# Altium PCB Water Tank Telemeter.PcbDoc (part 1 of 2)
Units mil, origin at the board's own origin, x right, y up, seen from the top; angles counter-clockwise.
Board outline 8312.51 x 5080.46 mil, 2 copper layers (Top Layer, Bottom Layer); 201 components, 141 nets, 680 pads, 198 vias.
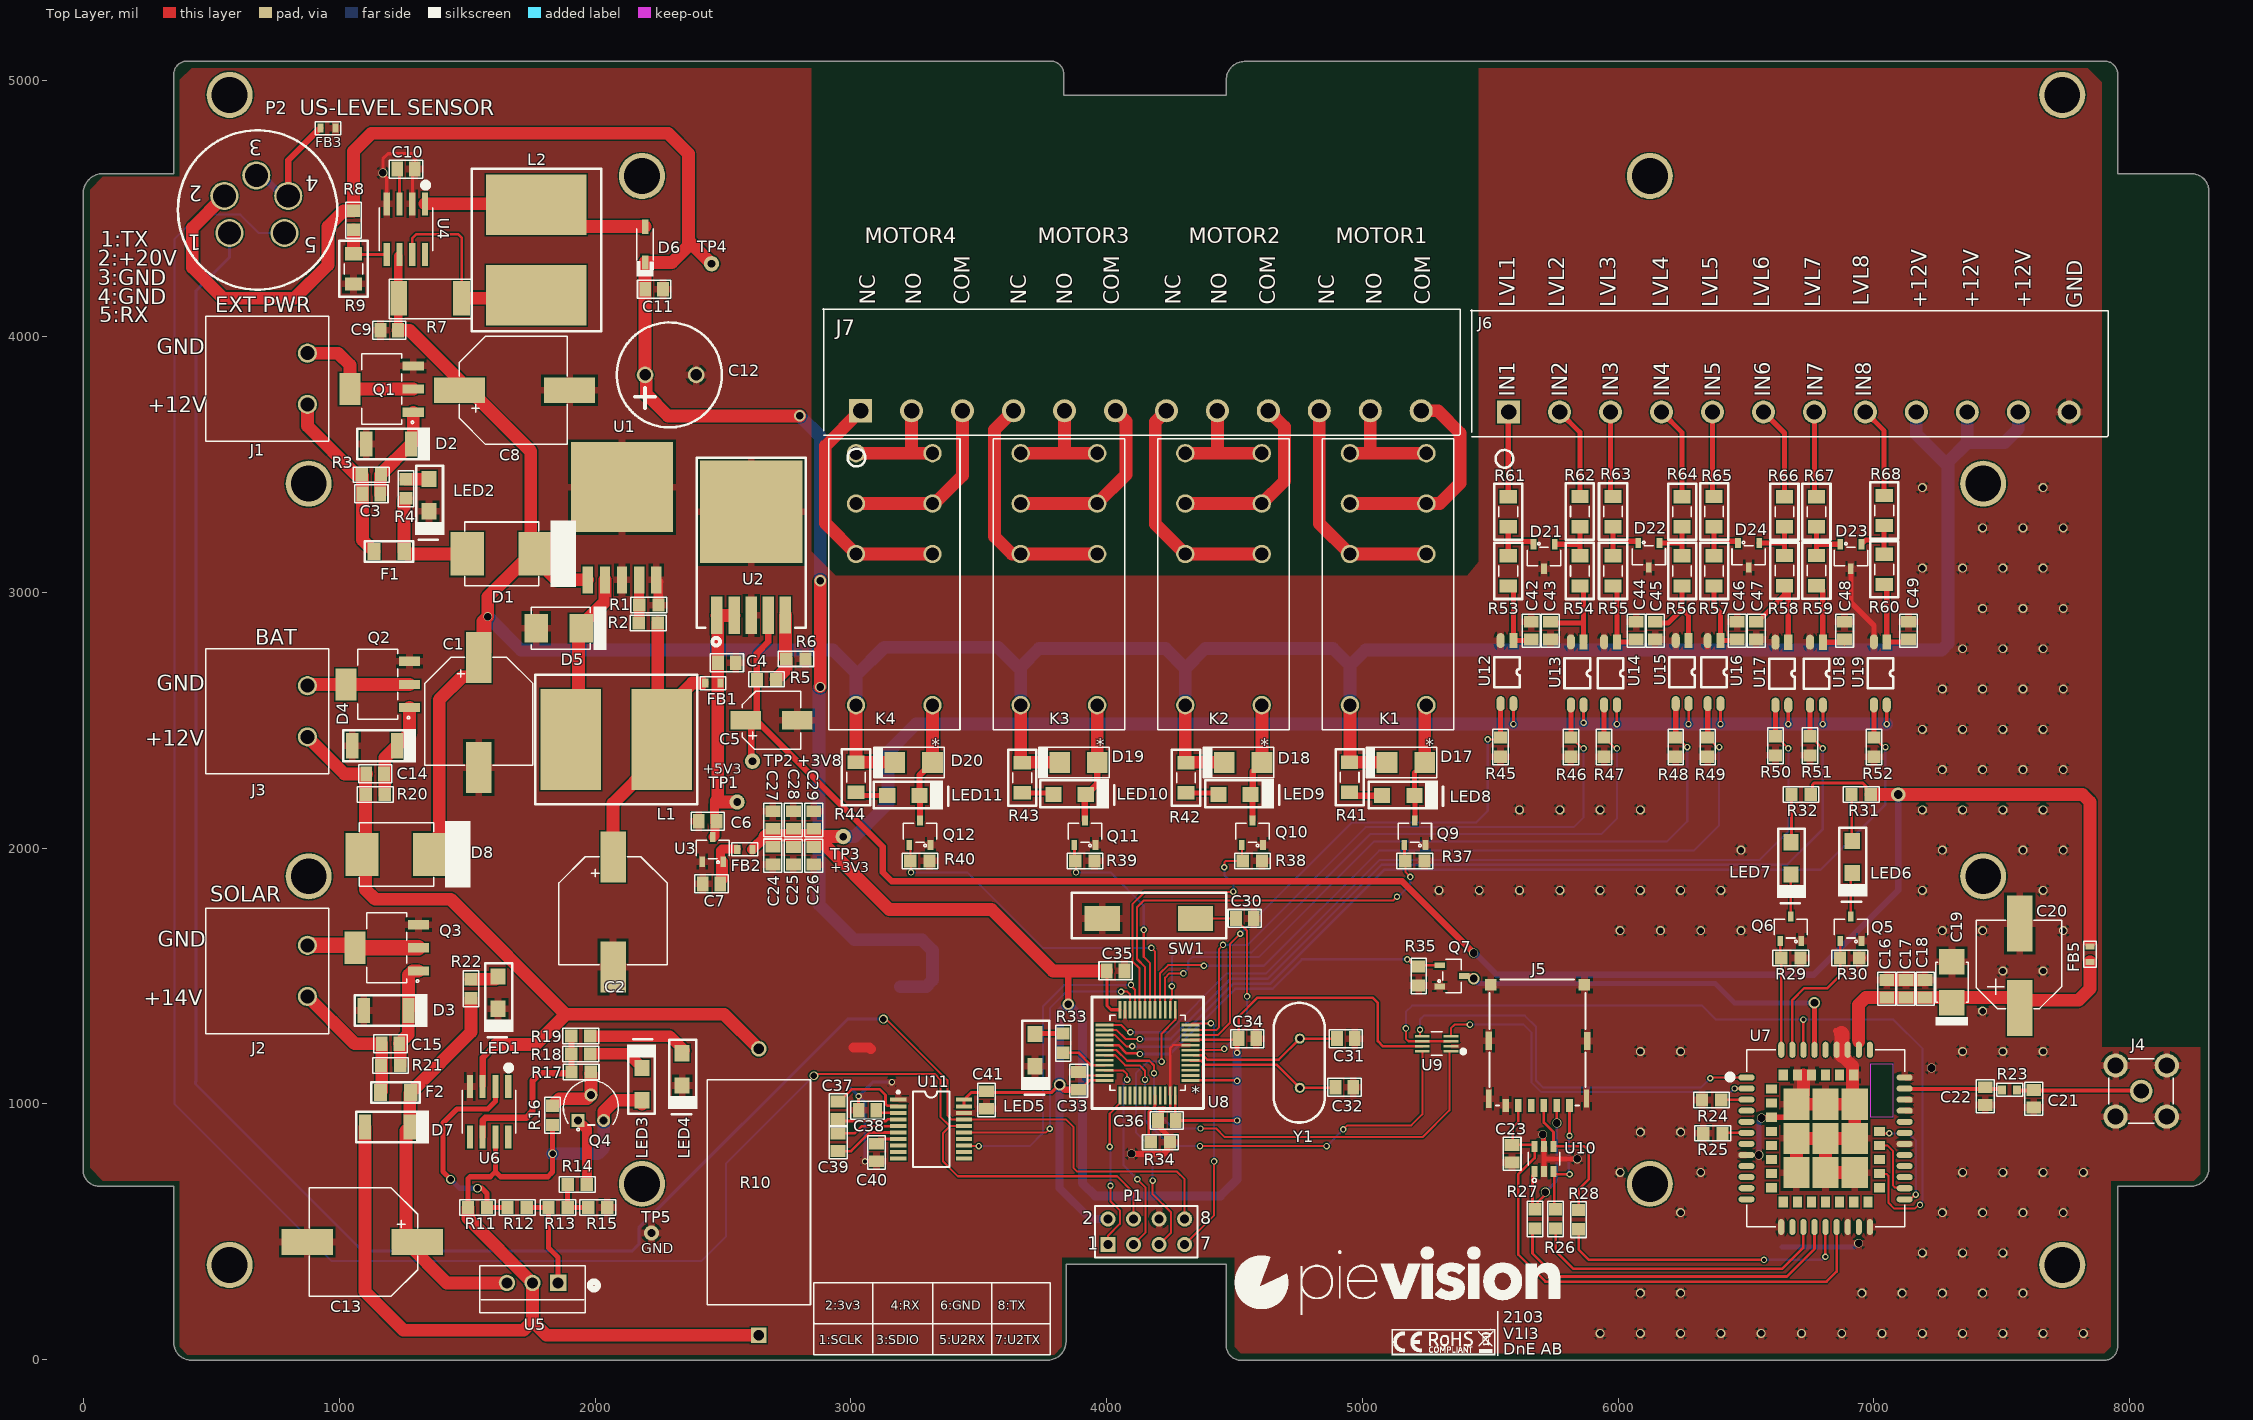
[diagram p0: Top Layer view]
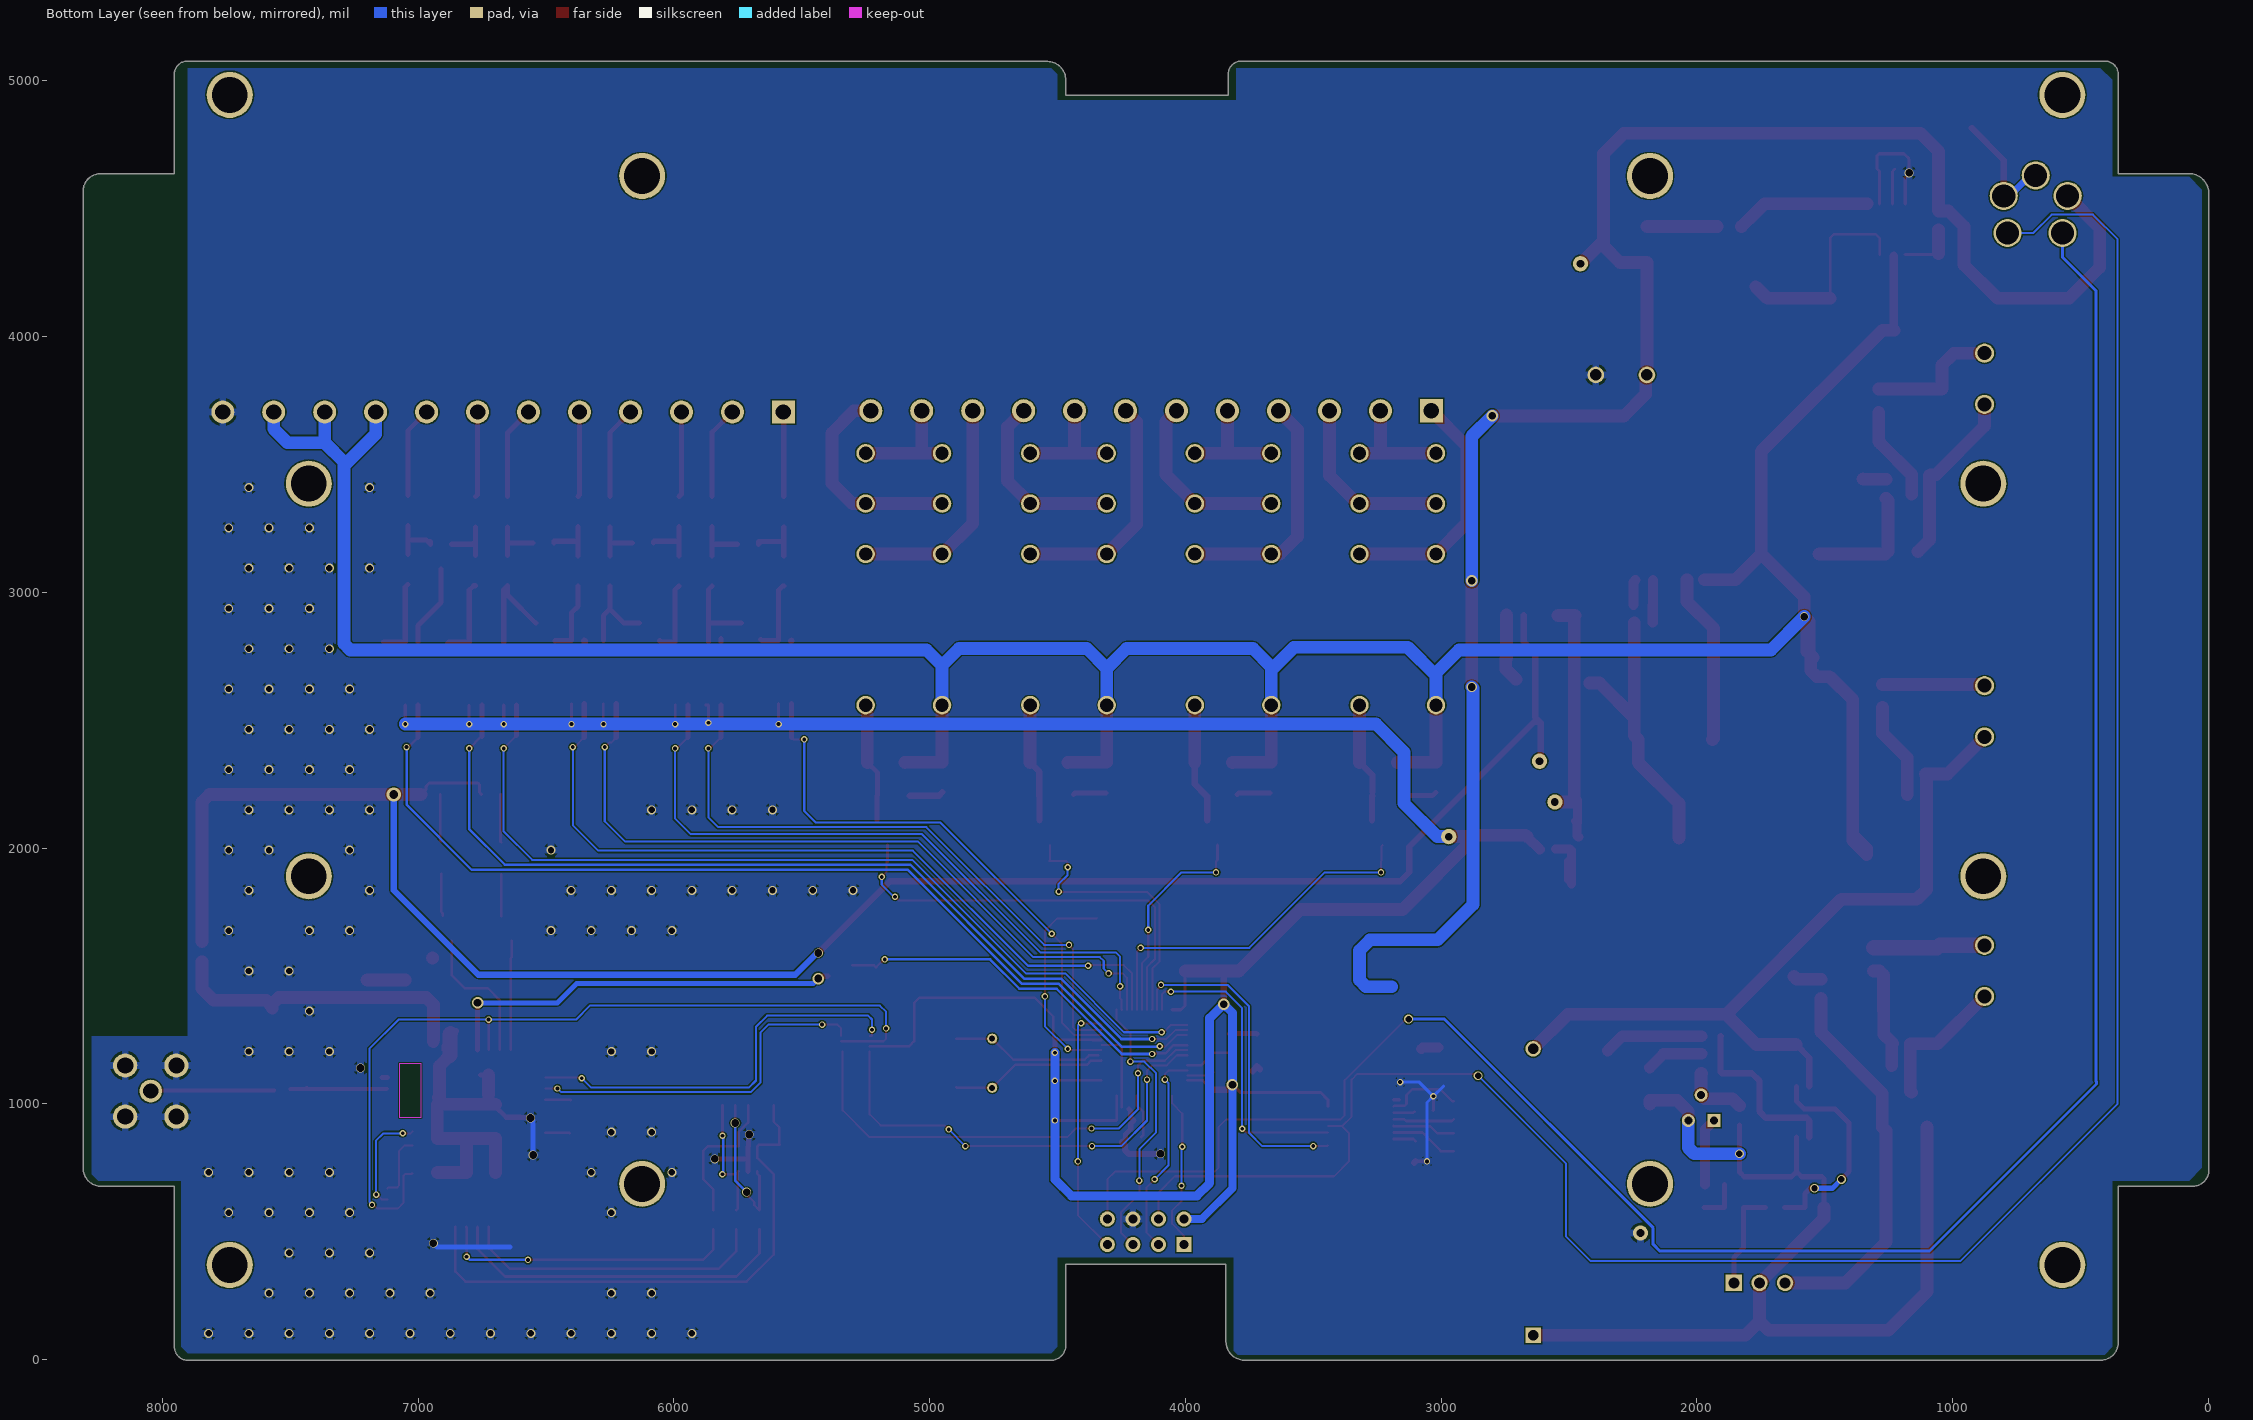
[diagram p1: Bottom Layer view, seen from below]
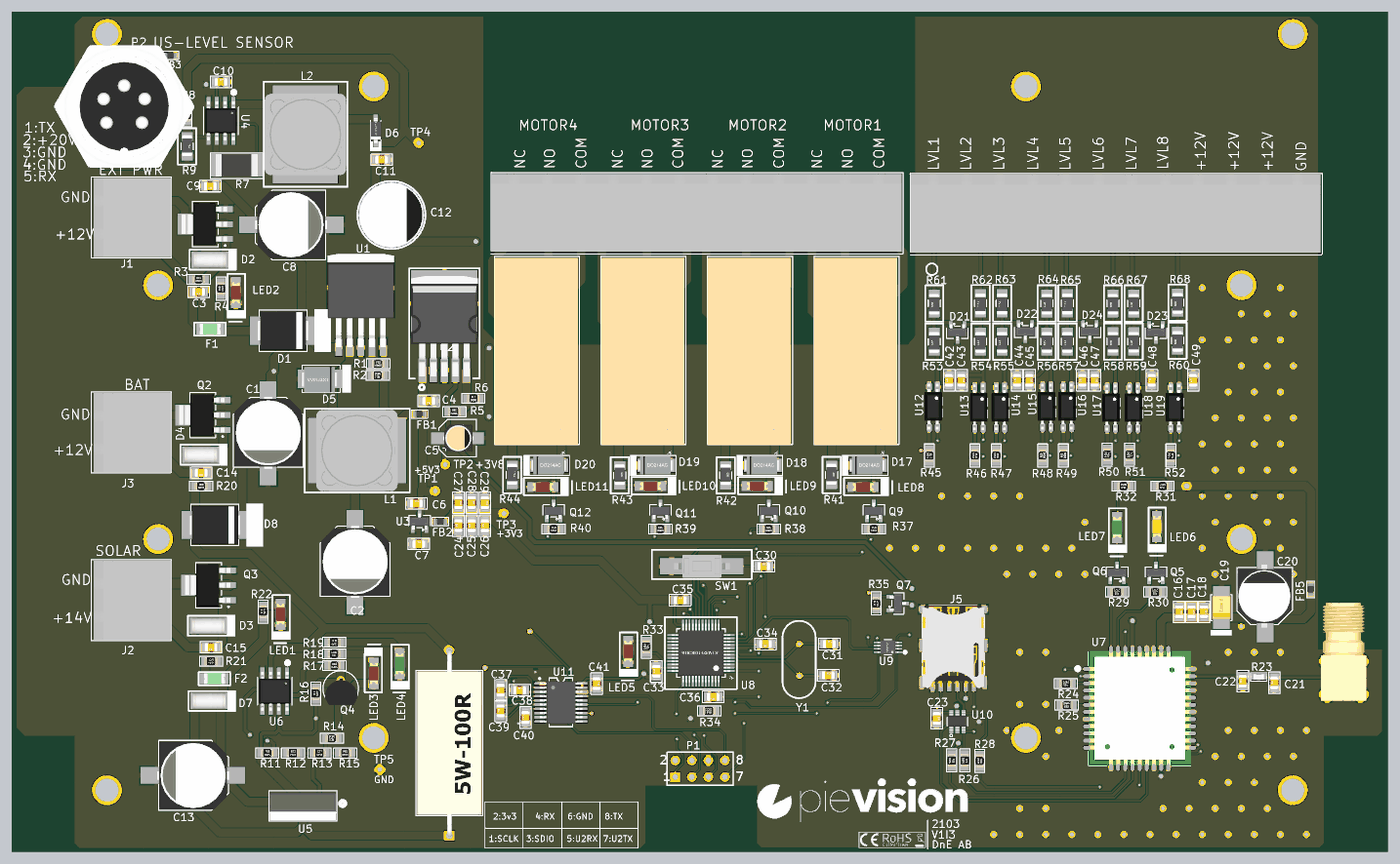
[diagram p3: 3D render of the assembled board from above, using the file's embedded part models]

## Layer stack, top to bottom
Top Solder: solder mask 0.4, Solder Resist, Dk 3.5
Top Layer: signal copper 1.4
Dielectric1: dielectric 12.6, FR-4, Dk 4.8
Bottom Layer: signal copper 1.4
Bottom Solder: solder mask 0.4, Solder Resist, Dk 3.5

## Board outline
351.82,70.04 ccw(c422.17,67.83) 419.92,-2.51 ccw(c420,0) 420,-2.51 3763.13,-2.51 ccw(c3764.54,-0.43) 3764.48,-2.95 ccw(c3766.35,71.8) 3841.1,69.94 ccw(c3838.58,70) 3841.1,70 3841.1,371.75 ccw(c3840,374.02) 3842,372.48 4467.48,372.48 4467.48,54.99 ccw(c4524.99,54.99) 4524.98,-2.51 ccw(c4524.98,0) 4524.98,-2.51 7898.91,-2.51 ccw(c7900,-0.25) 7900,-2.76 ccw(c7900,50) 7952.76,50 ccw(c7950.25,50) 7952.51,51.09 7952.51,677.48 8238.26,677.48 ccw(c8238.54,748.54) 8309.6,748.26 ccw(c8307.09,748.27) 8309.6,748.27 8309.6,4566.17 ccw(c8307.48,4567.52) 8310,4567.52 ccw(c8240,4567.52) 8240,4637.52 7952.51,4637.52 7952.51,5025 ccw(c7902.99,5027.06) 7952.56,5027.06 ccw(c7902.99,5027.06) 7952.51,5029.12 7952.51,5035 ccw(c7950,5035) 7951.56,5036.98 ccw(c7902.99,5027.06) 7899.92,5076.53 4540,5076.53 ccw(c4540,5074.02) 4538.24,5075.81 ccw(c4540,5003.32) 4467.49,5004.04 ccw(c4470,5004.01) 4467.51,5003.68 ccw(c4470,5003.32) 4467.48,5003.32 4467.48,4943.5 3832.52,4943.5 3832.52,5025 ccw(c3780,5025) 3780,5077.52 405,5077.52 ccw(c405,5025) 352.48,5025 352.48,4637.52 75.91,4637.52 ccw(c75.91,4635) 75.88,4637.51 ccw(c76.79,4558.21) -2.51,4557.33 ccw(c76.79,4558.21) -2.51,4557.31 -2.51,4557.34 -2.51,745.05 ccw(c62.5,742.5) 59.9,677.49 ccw(c60,680) 60,677.48 351.82,677.48 351.82,70.04 cw(c422.17,67.83)

## Design rules (kind name [scope] priority, off if disabled: settings)
Clearance [All] p1: gap=5 ignorepadtopadclearanceinfootprint=FALSE except(0: Arc-Hole Track-Hole SMDPad-Hole Via-Hole Fill-Hole Poly-Hole Region-Hole Text-Hole; 1: Arc-Text Track-Text SMDPad-Text THPad-Text Via-Text Fill-Text Poly-Text Region-Text Text-Text; 8: Arc-SMDPad Track-SMDPad; 10: Arc-Arc Arc-Track Arc-Via Track-Track Track-Via SMDPad-Via THPad-Via Via-Via; 13: Arc-THPad Track-THPad SMDPad-THPad; 21.26: THPad-Hole; 22: THPad-THPad)
HoleSize [All] p1: absolutevalues=TRUE maxlimit=240 minlimit=8 maxpercent=80.000 minpercent=20.000
MinimumSolderMaskSliver [All] p1: minsoldermaskwidth=1
PolygonConnect [All] p1: connectstyle=Relief reliefconductorwidth=28 reliefentries=4 polygonreliefangle="90 Angle" airgapwidth=10
RoutingVias [All] p1: holewidth=30 width=35 viastyle="Through Hole" minholewidth=12 minwidth=24 maxholewidth=236 maxwidth=290
SilkToSilkClearance [All] p1: silktosilkclearance=0
SilkToSolderMaskClearance SilkscreenOverComponentPads [IsPad] p1: minsilkscreentomaskgap=0 clearancetoexposedcopper=TRUE
SolderMaskExpansion [All] p1: expansion=4 istentingtop=FALSE
Width [All] p1: maxlimit=80 minlimit=5 preferedwidth=10
26 further rules are at their usual default settings.

## Classes and differential pairs
component class Designator: C42 C43 C44 C45 C46 C47 C48 C49 D17 D18 D19 D20 D21 D22 D23 D24 FB3 J6 J7 K1 K2 K3 K4 LED8 LED9 LED10 LED11 P2 Q9 Q10 Q11 Q12 R37 R38 R39 R40 R41 R42 R43 R44 R45 R46 R47 R48 R49 R50 R51 R52 R53 R54 R55 R56 R57 R58 R59 R60 R61 R62 R63 R64 R65 R66 R67 R68 U12 U13 U14 U15 U16 U17 U18 U19
component class Designator: 30 C16 C17 C18 C19 C20 C21 C22 C23 C24 C25 C26 C27 C28 C29 C30 C31 C32 C33 C34 C35 C36 C37 C38 C39 C40 C41 FB5 J4 J5 LED5 LED6 LED7 P1 Q5 Q6 Q7 R23 R24 R25 R26 R27 R28 R29 R30 R31 R32 R33 R34 R35 S1 SW1 U7 U8 U9 U10 U11 Y1
component class Designator: C1 C2 C3 C4 C5 C6 C7 C8 C9 C10 C11 C12 C13 C14 C15 D1 D2 D3 D4 D5 D6 D7 D8 F1 F2 FB1 FB2 J1 J2 J3 L1 L2 LED1 LED2 LED3 LED4 Q1 Q2 Q3 Q4 R1 R2 R3 R4 R5 R6 R7 R8 R9 R10 R11 R12 R13 R14 R15 R16 R17 R18 R19 R20 R21 R22 TP1 TP2 TP3 TP4 TP5 U1 U2 U3 U4 U5 U6

## Components (designator, comment, footprint, x,y, rotation, side; value= is the part's Value field where it differs from the comment)
C1 "100uF" CAP_AL_1010 1545,2535 r270 top
C2 "470uF" CAP_AL_1010 2070,1755 r270 top
C3 "10nF" CAP_0805 1125,3385 r180 top
C4 "330nF" CAP_0805 2515,2725 r180 top
C5 "10uF" CAP_AL_0553 2689.5,2500 r0 top
C6 "1uF" CAP_0805 2440,2105 r0 top
C7 "1uF" CAP_0805 2455,1860 r0 top
C8 "470uF" CAP_AL_1010 1680,3790 r0 top
C9 "100nF" CAP_0805 1195,4025 r180 top
C10 "2.2nF" CAP_0805 1260,4655 r0 top
C11 "100nF" CAP_0805 2230.55,4185 r0 top
C12 "330uF" CAP_AL_THT_10X20X5MM 2195,3850 r0 top
C13 "100uF" CAP_AL_1010 1094.5,460 r180 top
C14 "10nF" CAP_0805 1140,2290 r180 top
C15 "10nF" CAP_0805 1200,1235 r180 top
C16 "10nF" CAP_0805 7050,1450 r270 top
C17 "33pF" CAP_0805 7125,1450 r270 top
C18 "1uF" CAP_0805 7200,1450 r270 top
C19 "100uF" CAP_TANT_CASEB 7305,1475 r90 top
C20 "1000uF" CAP_AL_0810 7570,1545 r90 top
C21 "22pF" CAP_0805 7625,1020 r90 top
C22 "22pF" CAP_0805 7435,1030 r90 top
C23 "1uF" CAP_0805 5585,805 r270 top
C24 "10nF" CAP_0805 2695,1970.55 r90 top
C25 "10nF" CAP_0805 2775,1970 r90 top
C26 "100nF" CAP_0805 2855,1970 r90 top
C27 "100nF" CAP_0805 2695,2110 r270 top
C28 "100nF" CAP_0805 2775,2110 r270 top
C29 "1uF" CAP_0805 2855,2110 r270 top
C30 "100nF" CAP_0805 4540,1725 r0 top
C31 "20pF" CAP_0805 4935,1255 r0 top
C32 "20pF" CAP_0805 4929.45,1065 r0 top
C33 "100nF" CAP_0805 3890,1090 r90 top
C34 "100nF" CAP_0805 4550,1255 r180 top
C35 "100nF" CAP_0805 4035,1520 r0 top
C36 "4.7uF" CAP_0805 4235,935 r180 top
C37 "100nF" CAP_0805 2950,975 r90 top
C38 "100nF" CAP_0805 3065,975 r0 top
C39 "100nF" CAP_0805 2950,850 r90 top
C40 "100nF" CAP_0805 3100,810 r90 top
C41 "100nF" CAP_0805 3530,1015 r270 top
C42 "100nF" CAP_0805 5660,2850 r90 top
C43 "100nF" CAP_0805 5735,2850 r270 top
C44 "100nF" CAP_0805 6070,2850 r90 top
C45 "100nF" CAP_0805 6145,2850 r270 top
C46 "100nF" CAP_0805 6465,2850 r90 top
C47 "100nF" CAP_0805 6540,2850 r270 top
C48 "100nF" CAP_0805 6885,2850 r90 top
C49 "100nF" CAP_0805 7135,2850 r90 top
D1 "S6M" DO-214AB 1635,3150 r180 top
D2 "ZM4740" MELF 1205,3580 r180 top
D3 "ZM4740" MELF 1195,1365 r180 top
D4 "ZM4740" MELF 1150,2400 r180 top
D5 "SR35_R2_00001" DO214AA 1865,2860 r180 top
D6 "B5819" SOD123 2195,4360 r90 top
D7 "ZM4751" MELF 1200,910 r180 top
D8 "S6M" DO-214AB 1223,1975 r180 top
D17 "M7_R2_00001" DID_SMA 5170,2335 r180 top
D18 "M7_R2_00001" DID_SMA 4533.43,2335 r180 top
D19 "M7_R2_00001" DID_SMA 3890,2335 r180 top
D20 "M7_R2_00001" DID_SMA 3245,2335 r180 top
D21 "SM05T1G" SOT-23 5710,3140 r180 top
D22 "SM05T1G" SOT-23 6120,3145 r180 top
D23 "SM05T1G" SOT-23 6910,3140 r180 top
D24 "SM05T1G" SOT-23 6510,3145 r180 top
F1 "1206SFS600F" FUS_1206 1194,3160 r180 top
F2 "1206SFS600F" FUS_1206 1220,1045 r180 top
FB1 "33R" FB_0603 2460,2645 r0 top
FB2 "33R" FB_0603 2585,1995 r0 top
FB3 "33R" FB_0603 955,4815 r180 top
FB5 "33R" FB_0603 7845,1585 r90 top
J1 "KF2EDG" TERM_BLK_2P_F 875,3735 r270 top
J2 "KF2EDG" TERM_BLK_2P_F 875,1420 r270 top
J3 "KF2EDG" TERM_BLK_2P_F 875,2435 r270 top
J4 "SMA" CONN_SMA_H 8045,1050 r90 top
J5 "Nano SIM Card Connector, Push & Pull" SOC_NSIM 5685,1240 r180 top
J6 "Screw Ter. Blk." TERM_BLK_12P 5571.55,3705 r90 top
J7 "Screw Ter. Blk." TERM_BLK_12P 3037.91,3710 r90 top
K1 "JW2SN" RELAY_DPDT 5250,2559 r180 top
K2 "JW2SN" RELAY_DPDT 4606.33,2559 r180 top
K3 "JW2SN" RELAY_DPDT 3962.67,2559 r180 top
K4 "JW2SN" RELAY_DPDT 3319,2559 r180 top
L1 "100uH" IND_1212 2220,2425 r180 top
L2 "100uH" IND_1212 1770,4476 r270 top
LED1 "HL-PC" LED_RED_1206 1620,1435 r90 top
LED2 "HL-PC" LED_RED_1206 1350,3380 r90 top
LED3 "HL-PC" LED_RED_1206 2183.5,1077.01 r270 top
LED4 "HL-PC" LED_GREEN_1206 2340,1135 r90 top
LED5 "HL-PC" LED_RED_1206 3720,1210 r90 top
LED6 "HL-PC" LED_YELLOW_1206 6915,1965 r90 top
LED7 "HL-PC" LED_GREEN_1206 6675,1960 r90 top
LED8 "HL-PC" LED_RED_1206 5140,2205 r180 top
LED9 "HL-PC" LED_RED_1206 4500,2210 r180 top
LED10 "HL-PC" LED_RED_1206 3855,2210 r180 top
LED11 "HL-PC" LED_RED_1206 3205,2205 r180 top
P1 "HDR_4X2" HDR2X4 4005,450 r0 top
P2 "MIC Connector" CONN_MIC_5P 630,4465 r180 top
Q1 "NDT3055L" SOT223 1165,3795 r90 top
Q2 "NDT3055L" SOT223 1150,2640 r90 top
Q3 "NDT3055L" SOT223 1185,1610 r90 top
Q4 "BC327" TO-92 1933.31,934.86 r0 top
Q5 "UTM2054G" SOT-23 6910,1685 r0 top
Q6 "UTM2054G" SOT-23 6675,1685 r0 top
Q7 "UTM2054G" SOT-23 5350,1500 r270 top
Q9 "ZXMN3A" SOT-23 5205,2060 r0 top
Q10 "ZXMN3A" SOT-23 4570,2060 r0 top
Q11 "ZXMN3A" SOT-23 3915,2060 r0 top
Q12 "ZXMN3A" SOT-23 3270,2060 r0 top
R1 "1K" RES_0805 2210,2950 r0 top
R2 "3.3K" RES_0805 2207.5,2880 r180 top
R3 "10K" RES_0805 1125,3460 r0 top
R4 "10K" RES_0805 1260,3405 r90 top
R5 "2.1K" RES_0805 2670,2660 r0 top
R6 "1K" RES_0805 2785,2740 r0 top
R7 "150mR" RES_2512 1355,4150 r0 top
R8 "15K" RES_0805 1055,4455 r270 top
R9 "1K" RES_1206 1055,4265 r90 top
R10 "100R" RES_AXL_22X9 2640,1215 r90 top
R11 "3.3R" RES_0805 1540,595 r0 top
R12 "220R" RES_0805 1695,595 r0 top
R13 "2.7K" RES_0805 1855,595 r0 top
R14 "1.5K" RES_0805 1930,685 r180 top
R15 "100R" RES_0805 2010,595 r0 top
R16 "4.7K" RES_0805 1833.5,955 r90 top
R17 "4.7K" RES_0805 1945,1125 r0 top
R18 "1.8K" RES_0805 1943.5,1195 r180 top
R19 "1.8K" RES_0805 1943.5,1265 r0 top
R20 "10K" RES_0805 1140,2210 r0 top
R21 "10K" RES_0805 1200,1150 r0 top
R22 "10K" RES_0805 1515,1450 r90 top
R23 "49.9R" RES_0603 7500.94,1055 r0 top
R24 "10K" RES_0805 6365,1015 r180 top
R25 "10K" RES_0805 6370,885 r180 top
R26 "22R" RES_0805 5755,550 r270 top
R27 "22R" RES_0805 5675,550 r270 top
R28 "22R" RES_0805 5845,547.5 r270 top
R29 "47.5K" RES_0805 6675,1570 r180 top
R30 "47.5K" RES_0805 6905,1570 r180 top
R31 "150R" RES_0805 6950,2210 r180 top
R32 "150R" RES_0805 6715,2210 r180 top
R33 "130R" RES_0805 3830,1237.5 r270 top
R34 "10K" RES_0805 4210,850 r180 top
R35 "47.5K" RES_0805 5220,1500 r90 top
R37 "47.5K" RES_0805 5205,1950 r0 top
R38 "47.5K" RES_0805 4570,1950 r0 top
R39 "47.5K" RES_0805 3915,1950 r0 top
R40 "47.5K" RES_0805 3270,1950 r0 top
R41 "510R" RES_1206 4950,2277.01 r90 top
R42 "510R" RES_1206 4310,2275 r90 top
R43 "510R" RES_1206 3670,2275 r90 top
R44 "510R" RES_1206 3020,2277.01 r90 top
R45 "130R" RES_0805 5540,2395 r270 top
R46 "130R" RES_0805 5815,2395 r270 top
R47 "130R" RES_0805 5945,2395 r270 top
R48 "130R" RES_0805 6225,2395 r90 top
R49 "130R" RES_0805 6350,2395 r90 top
R50 "130R" RES_0805 6615,2400 r270 top
R51 "130R" RES_0805 6750,2400 r270 top
R52 "130R" RES_0805 7000,2395 r270 top
R53 "200R" RES_1206 5570,3084 r270 top
R54 "200R" RES_1206 5850,3084 r270 top
R55 "200R" RES_1206 5980,3084 r270 top
R56 "200R" RES_1206 6250,3084 r270 top
R57 "200R" RES_1206 6375,3084 r270 top
R58 "200R" RES_1206 6650,3085 r270 top
R59 "200R" RES_1206 6775,3085 r270 top
R60 "200R" RES_1206 7040,3090 r270 top
R61 "330R" RES_1206 5570,3315 r270 top
R62 "330R" RES_1206 5850,3316 r270 top
R63 "330R" RES_1206 5980,3316 r270 top
R64 "330R" RES_1206 6250,3315 r270 top
R65 "330R" RES_1206 6375,3316 r270 top
R66 "330R" RES_1206 6650,3315 r270 top
R67 "330R" RES_1206 6775,3315 r270 top
R68 "330R" RES_1206 7040,3320 r270 top
SW1 "SWC" TAC_0603_VT 4165,1725 r180 top
TP1 "TP_25MILC" TP 2555,2180 r0 top
TP2 "TP_25MILC" TP 2615,2340 r90 top
TP3 "TP_25MILC" TP 2970,2045 r90 top
TP4 "TP_25MILC" TP 2455,4285 r90 top
TP5 "TP_25MILC" TP 2220,495 r90 top
U1 "P2576L-ADJ" TO170P1435X465-6N 2105,3405 r0 top
U2 "LD29300" D2PAK/A 2476.14,2910 r0 top
U3 "3.3V" SOT-23 2460,1995 r0 top
U4 "NCV3063" SOIC-8 1260,4420 r270 top
U5 "LM317T" TO-220AB 1855,300 r180 top
U6 "TL071CDR" SOIC-8 1585,969.05 r270 top
U7 "MG2609" LCC_17P6X15P7X2P3 6810.83,865 r0 top
U8 "STM32F103C8T7" LQFP-48 4160,1200 r180 top
U9 "LVL TRANSL" VSSOP8 5290,1235 r180 top
U10 "ESDA6V" SOT23-6L 5710,785 r90 top
U11 "ST3222BTR" TSSOP20 3185,1016.18 r270 top
U12 "LTV-217" SSOP-4 5590,2811.06 r270 top
U13 "LTV-217" SSOP-4 5865,2806.06 r270 top
U14 "LTV-217" SSOP-4 5995,2806.06 r270 top
U15 "LTV-217" SSOP-4 6275,2811.06 r270 top
U16 "LTV-217" SSOP-4 6400,2811.06 r270 top
U17 "LTV-217" SSOP-4 6665,2805 r270 top
U18 "LTV-217" SSOP-4 6800,2805 r270 top
U19 "LTV-217" SSOP-4 7050,2806.06 r270 top
Y1 "8MHZ" CRYS_THT 4755,1255 r270 top

## Footprints (in the part's own frame and the unit in brackets; to place one, negate y for a bottom-side part, rotate by r counter-clockwise, add the part's x,y. Pads: shape width x height; smd on the part's side, far side on the other; paste and mask are expansions set on the pad)
CAP_0805 [mm]
  rect 1.16x1.47 smd: 1(-0.875,0) 2(0.875,0)
  silkscreen extent -1.65,-0.89 1.65,0.89, body extent -1.3,-0.62 1.3,0.62, height 0.78
CAP_AL_0553 [mil]
  rect 119x71 smd paste+0 mask+0: 1(-100,0) 2(100,0)
  silkscreen extent -114,-114 114,114, body extent -86,-85 95,84, height 213
CAP_AL_0810 [mil]
  rect 220x100 smd paste+0 mask+0: 1(-170,0) 2(160,0)
  silkscreen extent -172,-165 172,170, body extent -191,-158 191,168, height 335
CAP_AL_1010 [mil]
  rect 200x100 smd paste+0 mask+0: 1(-210,0) 2(220,0)
  silkscreen extent -212,-212 212,212, body extent -214,-204 220,206, height 410
CAP_AL_THT_10X20X5MM [mil]
  round 65 hole 45: 1(0,0) 2(200,0)
  silkscreen extent -110,-205 300,205, body extent -105,-200 295,200, height 492
CAP_TANT_CASEB [mil]
  rect 100x100 smd paste+0 mask+0: 1(-80,0) 2(80,0)
  silkscreen extent -169,-64 78,65, body extent -69,-55 69,55, height 75
CONN_MIC_5P [mil]
  round 110 hole 90: 1(60,60) 2(80,-85) 3(-45,-165) 4(-170,-85) 5(-155,60)
  silkscreen extent -361,-341 261,281, body extent -469,-412 379,330, height 600
CONN_SMA_H [mm]
  round 2.25 hole 1.5: 1(0,0)
  round 2.4 hole 1.6: 2(-2.54,-2.54) 2(-2.54,2.54) 2(2.54,-2.54) 2(2.54,2.54)
  silkscreen extent -3.2,-3.2 3.2,3.2, body extent -3.52,-3.45 11.58,3.55, height 9.86
CRYS_THT [mm]
  round 1 hole 0.6: 1(0,0) 2(4.88,0)
  silkscreen extent -3.55,-2.59 8.33,2.49
D2PAK/A [mm]
  rect 1.15x3.7 smd: 1(0,0) 2(1.7,0) 3(3.4,0) 4(5.1,0) 5(6.8,0.025)
  rect 10.2x10.2 smd: PAD(3.4,10.287)
  silkscreen extent -2.01,-3 8.81,15.67, body extent -1.7,-0.93 8.5,14.5, height 4.51
DID_SMA [mm]
  rect 2.07x2.06 smd: 1(-1.865,0) 2(1.865,0)
  silkscreen extent -3.05,-1.52 3.94,1.52, body extent -2.62,-1.4 2.87,1.4, height 2.29
DO214AA [mm]
  rect 2.35x2.85 smd paste+0 mask+0: 1(-2.032,0) 2(2.413,0)
  silkscreen extent -4.57,-2.16 2.92,2.16, body extent -2.54,-1.85 3.05,2.1, height 2.64
DO-214AB [mil]
  rect 130x170 smd paste+0 mask+0: 1(-130,0) 2(135,0)
  silkscreen extent -290,-130 145,130, body extent -154,-116 154,116, height 95
FB_0603 [mm]
  rect 0.6x0.9 smd: 1(-0.75,0) 2(0.75,0)
  silkscreen extent -1.27,-0.64 1.27,0.64, body extent -0.8,-0.4 0.8,0.4, height 0.8
FUS_1206 [mil]
  rect 52x67 smd paste+0 mask+0: 1(-59,0) 2(59,0)
  silkscreen extent -95,-40 95,40, body extent -63,-33 63,33, height 22
HDR2X4 [mm] "Connector; Header; 4x2 Position"
  rect 1.5x1.5 hole 0.9: 1(0,0)
  round 1.5 hole 0.9: 2(0,2.54) 3(2.54,0) 4(2.54,2.54) 5(5.08,0) 6(5.08,2.54) 7(7.62,0) 8(7.62,2.54)
  silkscreen extent -1.27,-1.27 8.89,3.81
IND_1212 [mm]
  rect 6x10 smd: 1(-1.016,0) 2(8.001,0)
  silkscreen extent -4.57,-6.4 11.56,6.45, body extent -2.72,-6.25 9.78,6.25, height 7.5
LCC_17P6X15P7X2P3 [mm]
  oval 1.6x0.6 smd: 1(-7.85,6.05) 2(-7.85,4.95) 3(-7.85,3.85) 4(-7.85,2.75) 5(-7.85,1.65) 6(-7.85,0.55) 7(-7.85,-0.55) 8(-7.85,-1.65) 9(-7.85,-2.75) 10(-7.85,-3.85) 11(-7.85,-4.95) 12(-7.85,-6.05) 22(7.85,-6.05) 23(7.85,-4.95) 24(7.85,-3.85) 25(7.85,-2.75) 26(7.85,-1.65) 27(7.85,-0.55) 28(7.85,0.55) 29(7.85,1.65) 30(7.85,2.75) 31(7.85,3.85) 32(7.85,4.95) 33(7.85,6.05)
  oval 0.6x1.6 smd: 13(-4.4,-8.8) 14(-3.3,-8.8) 15(-2.2,-8.8) 16(-1.1,-8.8) 17(0,-8.8) 18(1.1,-8.8) 19(2.2,-8.8) 20(3.3,-8.8) 21(4.4,-8.8) 34(4.4,8.8) 35(3.3,8.8) 36(2.2,8.8) 37(1.1,8.8) 38(0,8.8) 39(-1.1,8.8) 40(-2.2,8.8) 41(-3.3,8.8) 42(-4.4,8.8)
  rect 1.1x0.9 smd: 43(-5.35,4.9) 44(-5.35,3.5) 45(-5.35,2.1) 46(-5.35,0.7) 47(-5.35,-0.7) 48(-5.35,-2.1) 49(-5.35,-3.5) 50(-5.35,-4.9) 58(5.35,-4.9) 59(5.35,-3.5) 60(5.35,-2.1) 61(5.35,-0.7) 62(5.35,0.7)
  rect 0.9x1.1 smd: 51(-4.2,-6.3) 52(-2.8,-6.3) 53(-1.4,-6.3) 54(0,-6.3) 55(1.4,-6.3) 56(2.8,-6.3) 57(4.2,-6.3) 63(2.8,6.3) 64(1.4,6.3) 65(0,6.3) 66(-1.4,6.3) 67(-2.8,6.3) 68(-4.2,6.3)
  rect 2.6x3.1 smd: 69(-2.9,3.4) 70(-2.9,0) 71(-2.9,-3.4) 72(0,-3.4) 73(2.9,-3.4) 74(2.9,0) 75(2.9,3.4) 76(0,3.4) 77(0,0)
  Keep-Out Layer region: 4.502,7.4 6.65,7.4 6.65,2.101 4.502,2.101
  Keep-Out Layer region: 4.504,7.4 6.65,7.4 6.65,2.102 4.504,2.102
  Keep-Out Layer region: 4.508,7.4 6.65,7.4 6.65,2.104 4.508,2.104
  Keep-Out Layer region: 4.502,7.4 6.65,7.4 6.65,2.101 4.502,2.101
  Keep-Out Layer region: 4.504,7.4 6.65,7.4 6.65,2.102 4.504,2.102
  Keep-Out Layer region: 4.508,7.4 6.65,7.4 6.65,2.104 4.508,2.104
  Keep-Out Layer region: 4.502,7.4 6.65,7.4 6.65,2.101 4.502,2.101
  Keep-Out Layer region: 4.504,7.4 6.65,7.4 6.65,2.102 4.504,2.102
  Keep-Out Layer region: 4.508,7.4 6.65,7.4 6.65,2.104 4.508,2.104
  silkscreen extent -9.6,-8.8 7.85,8.8, body extent -7.82,-8.79 7.88,8.81, height 2.6
LED_GREEN_1206 [mm]
  rect 1.6x1.5 smd: 1(-1.6,0) 2(1.6,0)
  silkscreen extent -4.44,-1.52 2.92,1.4, body extent -1.61,-0.8 1.61,0.8, height 1.1
LED_RED_1206 [mm]
  rect 1.6x1.5 smd: 1(-1.6,0) 2(1.6,0)
  silkscreen extent -4.44,-1.52 2.92,1.4, body extent -1.61,-0.8 1.61,0.8, height 1.1
LED_YELLOW_1206 [mm]
  rect 1.6x1.5 smd: 1(-1.6,0) 2(1.6,0)
  silkscreen extent -4.44,-1.52 2.92,1.4, body extent -1.61,-0.8 1.61,0.8, height 1.1
LQFP-48 [mil]
  rect 70x11 smd paste+0 mask+0: 1(-168,108.27) 2(-168,88.58) 3(-168,68.9) 4(-168,49.21) 5(-168,29.53) 6(-168,9.84) 7(-168,-9.84) 8(-168,-29.53) 9(-168,-49.21) 10(-168,-68.9) 11(-168,-88.58) 12(-168,-108.27) 25(168,-108.27) 26(168,-88.58) 27(168,-68.9) 28(168,-49.21) 29(168,-29.53) 30(168,-9.84) 31(168,9.84) 32(168,29.53) 33(168,49.21) 34(168,68.9) 35(168,88.58) 36(168,108.27)
  rect 11x70 smd paste+0 mask+0: 13(-108.27,-168) 14(-88.58,-168) 15(-68.9,-168) 16(-49.21,-168) 17(-29.53,-168) 18(-9.84,-168) 19(9.84,-168) 20(29.53,-168) 21(49.21,-168) 22(68.9,-168) 23(88.58,-168) 24(108.27,-168) 37(108.27,168) 38(88.58,168) 39(68.9,168) 40(49.21,168) 41(29.53,168) 42(9.84,168) 43(-9.84,168) 44(-29.53,168) 45(-49.21,168) 46(-68.9,168) 47(-88.58,168) 48(-108.27,168)
  silkscreen extent -223,-223 223,223, body extent -177,-177 177,177, height 63
MELF [mil]
  rect 48x98.43 smd paste+0 mask+0: 1(-74.93,0) 2(100,0)
  silkscreen extent -150,-65 135,65, body extent -86,-49 110,49, height 97
RELAY_DPDT [mil]
  round 72 hole 52 mask+0: 1(0,0) 2(0,-591) 3(0,-788) 4(0,-985) 5(299,-985) 6(299,-788) 7(299,-591) 8(299,0)
  silkscreen extent -108,-1041 407,97, body extent -98,-1031 406,97, height 787
RES_0603 [mm]
  rect 0.8x0.9 smd: 1(0,0) 2(1.5,0)
  silkscreen extent -0.51,-0.64 2.03,0.64, body extent -0.06,-0.43 1.54,0.43, height 0.48
RES_0805 [mil]
  rect 48x51 smd paste+0 mask+0: 1(-37.5,0) 2(37.5,0)
  silkscreen extent -70,-30 70,30, body extent -39,-25 39,25, height 22
RES_1206 [mil]
  rect 52x67 smd paste+0 mask+0: 1(-59,0) 2(59,0)
  silkscreen extent -110,-55 110,55, body extent -58,-32 68,31, height 39
RES_2512 [mil]
  rect 66x136 smd paste+0 mask+0: 1(-123,0) 2(123,0)
  silkscreen extent -160,-80 160,75, body extent -128,-68 128,68, height 28
RES_AXL_22X9 [mil]
  rect 61x61 hole 41: 1(-1120,0)
  round 61 hole 41: 2(0,0)
  silkscreen extent -1000,-202 -120,202, body extent -1125,-197 10,197, height 354
SOC_NSIM [mm] "Nano SIM Card Connector, Push & Pull"
  rect 0.65x1.3 smd: C1(1.915,6.25) C2(-0.625,6.25) C3(-1.895,6.25) C5(3.185,6.25) C6(0.645,6.25) C7(-3.165,6.25)
  rect 0.635x1.8 smd: Shield(-4.926,-0.152) Shield(4.851,-0.178)
  rect 0.508x1.8 smd: Shield(-4.851,5.563) Shield(4.851,5.588)
  rect 1.143x1.143 smd: Shield(-4.648,-5.715) Shield(4.648,-5.715)
  silkscreen extent -4.78,-6.25 4.79,6.25, body extent -4.93,-6.25 4.94,6.25, height 1.2
SOD123 [mil]
  rect 55.75x25.65 smd paste+0 mask+0: 1(-69.91,0) 2(69.91,0)
  silkscreen extent -125,-34 61,34, body extent -75,-34 77,33, height 56
SOIC-8 [mil]
  rect 90x24.08 smd paste+0 mask+0: 1(-99.05,75) 2(-99.05,25) 3(-99.05,-25) 4(-99.05,-75) 5(99.05,-75) 6(99.05,-25) 7(99.05,25) 8(99.05,75)
  silkscreen extent -181,-104 84,104, body extent -118,-96 118,96, height 67
SOT23-6L [mil]
  rect 43x24 smd paste+0 mask+0: 1(-49,37) 2(-49,0) 3(-49,-37) 4(49,-37) 5(49,0) 6(49,37)
  silkscreen extent -92,-62 26,62, body extent -52,-57 58,57, height 39
SOT223 [mil]
  rect 36x83 smd paste+0 mask+0: 1(-90.55,-124) 2(0,-124) 3(90.55,-124)
  rect 126x83 smd paste+0 mask+0: 2(0,124)
  silkscreen extent -137,-125 137,78, body extent -128,-132 128,142, height 65
SOT-23 [mil]
  rect 22x40 smd paste+0 mask+0: 1(41.34,-48) 2(-41.34,-48) 3(0,48)
  silkscreen extent -65,-55 65,37, body extent -58,-49 58,49, height 40
SSOP-4 [mm]
  rect 1.5x0.8 smd: 1(0,0)
  oval 1.5x0.8 smd: 2(0,-1.27) 3(6.25,-1.27) 4(6.25,0)
  silkscreen extent 1.64,-1.9 4.61,0.64, body extent -0.45,-2.03 6.55,0.67, height 2.02
TAC_0603_VT [mm]
  rect 3.5x2.5 smd: 1(-4.625,0) 2(4.625,0)
  silkscreen extent -7.66,-2.54 7.66,1.96, body extent -4.33,-1.75 4.27,1.75, height 4.3
TERM_BLK_2P_F [mil]
  round 75 hole 55 mask+0: 1(-200,0) 2(0,0)
  silkscreen extent -345,-398 145,84, body extent -339,-385 140,85, height 330
TERM_BLK_12P [mil]
  rect 90x90 hole 60: 1(0,0)
  round 90 hole 60: 2(0,-199.28) 3(0,-398.55) 4(0,-597.82) 5(0,-797.09) 6(0,-996.37) 7(0,-1195.64) 8(0,-1394.91) 9(0,-1594.18) 10(0,-1793.46) 11(0,-1992.73) 12(0,-2192)
  silkscreen extent -218,-2344 399,148, body extent -81,-2334 389,146, height 330
TO170P1435X465-6N [mil]
  rect 40x106 smd: 1(-134,-356) 2(-67,-356) 3(0,-356) 4(67,-356) 5(134,-356)
  rect 400x352 smd: 6(0,6)
  body extent -200,-355 200,210, height 184
TO-92 [mil]
  rect 51x51 hole 31 mask+0: 1(0,0)
  round 51 hole 31 mask+0: 2(50,100) 3(100,0)
  silkscreen extent -57,-40 158,157, body extent -45,-51 152,111, height 370
TO-220AB [mil]
  rect 64x64 hole 44 mask+0: 1(0,0)
  round 64 hole 44 mask+0: 2(100,0) 3(200,0)
  silkscreen extent -155,-67 306,116, body extent -100,-55 300,111, height 805
TP [mil]
  round 60 hole 30: 1(0,0)
TSSOP20 [mm] "SO20 - 20 Leads; Body Width 7.5 mm; Pitch 1.27 mm"
  rect 0.4x1.6 smd: 1(0,0) 2(0.65,0) 3(1.3,0) 4(1.95,0) 5(2.6,0) 6(3.25,0) 7(3.9,0) 8(4.55,0) 9(5.2,0) 10(5.85,0) 11(5.85,6.55) 12(5.2,6.55) 13(4.55,6.55) 14(3.9,6.55) 15(3.25,6.55) 16(2.6,6.55) 17(1.95,6.55) 18(1.3,6.55) 19(0.65,6.55) 20(0,6.55)
  silkscreen extent -0.87,-0.12 6.67,5.07, body extent -0.38,0.03 6.22,6.58, height 1.2
VSSOP8 [mil]
  rect 58x10 smd paste+0 mask+0: 1(-56,29.53) 2(-56,9.84) 3(-56,-9.84) 4(-56,-29.53) 5(56,-29.53) 6(56,-9.84) 7(56,9.84) 8(56,29.53)
  silkscreen extent -109,-46 22,44, body extent -64,-41 62,41, height 35

## Part data
C1 C2 C8 C13: library part CAP_AL_1010, "=Product Description", .Checked PCB=CHK, .Checked SCH=CHK, Dimensions (mm) DxL=10.00x10.00
  C1 C13: Product Description="CAP.EL.100uF 63V 10x10 105C 5000Hrs SMD", Product Name=BXJ63VC100MJ10TP
  C2: Product Description="CAP.EL.470uF 25V 10x10 105C 2000Hrs SMD ±20%", Product Name=BDS25VC470MJ10TP
  C8: Product Description="CAP.EL.470uF 25V 10x10 105C 2000Hrs SMD", Product Name=BDS25VC470MJ10TP
C3 C6 C7 C9 C11 C14 C15 C16 C17 C18 C21 C22 C23 C24 C25 C26 C27 C28 C29 C30 C31 C32 C33 C34 C35 C37 C38 C39 C40 C41 C42 C43 C44 C45 C46 C47 C48 C49: library part CAP_0805, Package=0805
  C3 C14 C16 C24 C25: .Checked PCB=CHK, .Checked SCH=CHK, Product Description="MLCC (2012) 0805 10nF 50VDC ±5% C0G (NP0)", Product Name=CL21C103JBFNNNE
  C6 C7 C18 C23 C29: .Checked PCB=CHK, .Checked SCH=CHK, Product Description="MLCC (2012) 0805 1uF 50VDC -20% +80% Y5V", Product Name=CL21F105ZBFNNNE
  C9 C11 C26 C27 C28 C30 C33 C34 C35 C37 C38 C39 C40 C41 C42 C43 C44 C45 C46 C47 C48 C49: .Checked PCB=CHK, .Checked SCH=CHK, Product Description="MLCC (2012) 0805 100nF 50VDC ±5% X7R", Product Name=CL21B104JBCNNNC
  C15: .Checked PCB=., .Checked SCH=., Product Description="MLCC (2012) 0805 10nF 50VDC ±5% C0G (NP0)", Product Name=CL21C103JBFNNNE
  C17: .Checked PCB=CHK, .Checked SCH=CHK, Product Description="MLCC (2012) 0805 33pF 50VDC ±2% C0G (NP0)", Product Name=CL21C330GBANNNC
  C21 C22: .Checked PCB=CHK, .Checked SCH=CHK, Product Description="MLCC (2012) 0805 22pF 50VDC ±5% C0G (NP0)", Product Name=CL21C220JBANNNC
  C31 C32: .Checked PCB=CHK, .Checked SCH=CHK, Product Description="MLCC (2012) 0805 20pF 50VDC ±5% C0G (NP0)", Product Name=CL21C200JBANNNC
C4: library part CAP_0805, "=Product Description", Manufacturer=SAMSUNG, Package / Case=0805, .Checked PCB=CHK, .Checked SCH=CHK, Product Description="MLCC (2012) 0805 330nF 16VDC ±10% X7R", Product Name=CL21B334KOCNNNC
C5: library part CAP_AL_0553, "=Product Description", Manufacturer=SAMWHA, .Checked PCB=CHK, .Checked SCH=CHK, Product Description="CAP.EL.10uF 35V 5x5.3 85C SMD SAMWHA", Product Name=SC1V106M05005VR
C10: library part CAP_0805, "=Product Description", Package=0805, .Checked PCB=CHK, .Checked SCH=CHK, Product Description="MLCC (2012) 0805 2.2nF 50VDC ±5% X7R", Product Name=CL21B222JBANNNC
C12: library part CAP_AL_THT_10X12X5MM, "=Product Description", Manufacturer=SAMWHA, .Checked PCB=CHK, .Checked SCH=CHK, Product Description="CAP.EL.330uF 50V 10x20 105C 10000H TB", Product Name=LQ1H337M10020PA
C19: library part CAP_TANT_CASEB, "=Product Descriptipn", Case Dimension (mm) LxWxH="B CASE", .Checked PCB=CHK, .Checked SCH=CHK, Product Description="CAP.TANTAL 100uF 6.3V 10% B CASE (3528) SMD KEMET", Product Name=T491B107K006AT
C20: library part CAP_AL_0810, "=Product Description", Manufacturer=SAMYOUNG, .Checked PCB=CHK, .Checked SCH=CHK, Product Description="CAP.EL.1000uF 6V3 8x10 105C 5000Hrs SMD", Product Name=BXJ6.3VC1000MH10TP
C36: library part CAP_0805, "MLCC (2012) 0805 4.7uF 25VDC ±10% X5R", Package=0805, .Checked PCB=CHK, .Checked SCH=CHK, Product Description="MLCC (2012) 0805 4.7uF 25VDC ±10% X5R", Product Name=CL21A475KAQNNNE
D1 D8: library part DID_DO214, "=Product Description", Package=DO214AB, .Checked PCB=CHK, .Checked SCH=CHK, Product Description="DIODE 6A 1000V SMT DO214AB (SMC)", Product Name=S6M-DC
D2 D3 D4 D7: library part DID_ZEN_MELF, "=Product Description", Package=MELF
  D2 D3: .Checked PCB=., .Checked SCH=., Product Description="DIODE ZENER 1W 10V ±5% LL-41 (MELF) SMT", Product Name=ZM4740A-HT
  D4: .Checked PCB=CHK, .Checked SCH=CHK, Product Description="DIODE ZENER 1W 10V ±5% LL-41 (MELF) SMT", Product Name=ZM4740A-HT
  D7: .Checked PCB=., .Checked SCH=., Product Description="DIODE ZENER 1W 30V ±5% LL-41 (MELF) SMT", Product Name=ZM4751A-HT
D5: library part D_SCK_DO214AA, "Product Description", Manufacturer=PANJIT, Package / Case=DO214AA, .Checked PCB=CHK, .Checked SCH=CHK, Product Description="DIODE SCHOTTKY 3A 50V DO214AA SMB PANJIT", Product Name=SR35_R2_00001
D6: library part DID_SCHK_SOD123, "=Product Description", Package=SOD123, .Checked PCB=CHK, .Checked SCH=CHK, Product Description="DIODE SCHOTTKY 1A 40V SOD123", Product Name=B5819W
D17 D18 D19 D20: library part DID_SMA, "=Product Description", Package=SMA, Product Description="DIODE STAND. Single 1A 1000V SMT DO214AC (SMA)", Product Name=M7_R2_00001
  D17: .Checked PCB=CHK, .Checked SCH=CHK
  D18 D19 D20: .Checked PCB=., .Checked SCH=.
D21 D22 D23 D24: library part TVS_SOT23, "=Product Description", Package=SOT23, .Checked PCB=CHK, .Checked SCH=CHK, Product Description="DIODE TVS 5VWM 9.8VC SOT23", Product Name=SM05T1G
F1 F2: library part FUZ_SMD_1206, "=Product Description", Package=1206, Product Description="FUSE BOARD MOUNT 6A 24VDC 1206", Product Name=1206SFS600F/24-2
  F1: .Checked PCB=CHK, .Checked SCH=CHK
  F2: .Checked PCB=., .Checked SCH=.
FB1 FB2 FB3 FB5: library part FB_0603, "=Product Description", Manufacturer=MURATA, Package / Case=0603, .Checked PCB=CHK, .Checked SCH=CHK, Product Description="FERRITE BEAD 0603 33R 3A MURATA", Product Name=BLM18PG330SN1D
J1 J2 J3: library part TERM_BLK_2POS_F, "=Product Description", ComponentLink1Description="TERM.BLK.5.08MM 2P FEMALE GREEN", ComponentLink1URL=https://www.ozdisan.com/konnektor-ve-baglanti-elemanlari/klemensler/gecmeli-klemensler/KF2EDG-5-08-2P-14, Product Description="TERM.BLK.5.08MM 2P FEMALE GREEN", Product Name=KF2EDG-5.08-2P-14
J4: library part SMA_RA, "=Product Description", .Checked PCB=CHK, .Checked SCH=CHK, Mounting Type="THT R/A", Product Description="CONNECTOR SMA 5PIN THT R/A 8x8x14.8MM", Product Name=L-KLS1-SMA045
J5: library part SOC_NSIM, "=Product Description", Manufacturer=ATTEND, .Checked PCB=CHK, .Checked SCH=CHK, Eject Mechanism=PUSH-PULL, Number of Position=6, Product Description="CONNECTOR NANO SIM CARD PUSH PULL 6PIN H:1.2MM", Product Name=115U-A000
J6 J7: library part TERM_BLK_12POS, "=Product Description", .Checked PCB=CHK, .Checked SCH=CHK, ComponentLink1Description=https://www.molex.com/pdm_docs/sd/395321002_sd.pdf, ComponentLink1URL=https://www.molex.com/pdm_docs/sd/395321002_sd.pdf, Product Description="TERM.BLK.5.00MM 12P PCB TYPE", Product Name=GT301-5.0-12P-12-00AH
K1 K2 K3 K4: library part REL_DPDT_12V, "=Product Description", .Checked PCB=CHK, .Checked SCH=CHK, Contact Form=DPDT, Product Description="RELAY POWER 5A 12VDC 2P PANASONIC", Product Name=JW2SN-DC12V
L1 L2: library part IND_1212, "=Product Description", .Checked PCB=CHK, .Checked SCH=CHK, Dimensions (mm) LxWxH=12.00x12.00x8.00, Inductance=100uH, Product Description="INDUCTOR POWER 100UH 12X12X8MM SMD", Product Name=SRI1207-101M
LED1 LED2 LED3 LED5 LED8 LED9 LED10 LED11: library part LED_RED_1206, "=Product Description", Color=RED, Manufacturer=HONGLITRONIC, Product Description="LED SMD 1206 RED WATER CLEAR 90-120 mcd 140C", Product Name=HL-PC-3216S9AC
  LED1 LED3 LED5 LED8: .Checked PCB=CHK, .Checked SCH=CHK
  LED2 LED9 LED10 LED11: .Checked PCB=., .Checked SCH=.
LED4 LED7: library part LED_GREEN_1206, "=Product Description", Color=GREEN, Manufacturer=HONGLITRONIC, .Checked PCB=CHK, .Checked SCH=CHK, Product Description="LED SMD 1206 GREEN WATER CLEAR 600-800mcd", Product Name=HL-PC-3216U51GC
LED6: library part LED_YELLOW_1206, "=Product Description", Color=YELLOW, Manufacturer=HONGLITRONIC, .Checked PCB=CHK, .Checked SCH=CHK, Product Description="LED SMD 1206 YELLOW WATER CLEAR 90-120mcd 140C", Product Name=HL-PC-3216S29YC
P1: "=Product Description", .Checked PCB=CHK, .Checked SCH=CHK, LatestRevisionDate=17-Jul-2002, LatestRevisionNote="Re-released for DXP Platform.", Product Description="Header, 4-Pin, Dual row", Publisher="Altium Limited"
P2: library part CONN_MIC_5P, "=Product Description", ComponentLink1Description=https://www.molex.com/pdm_docs/sd/395321002_sd.pdf, ComponentLink1URL=https://www.molex.com/pdm_docs/sd/395321002_sd.pdf
Q1 Q2 Q3: library part MOSFET_N_SOT223, "=Product Description", Manufacturer=ONS, Package / Case=SOT223, .Checked PCB=CHK, .Checked SCH=CHK, Product Description="MOSFET DIS.4A 60V N-CH SOT223 ENHANCEMENT SMT", Product Name=NDT3055L
Q4: library part BJT_PNP_THT_CBE, "=Product Description", Package=TO-92, Product Description="TRANSISTOR DIS.500mA 50V PNP TO92 AMP THT	TRANSISTOR DIS.500mA 50V PNP TO92 AMP THT", Product Name=BC327-40ZL1G
Q5 Q6 Q7: library part MOSFET_N_SOT23, "=Product Description", Manufacturer=UTC, Package / Case=SOT23, .Checked PCB=CHK, .Checked SCH=CHK, Product Description="MOSFET DIS.5A 20V N-CH SOT23 ENHANCEMENT SMT", Product Name=UTM2054G-AE3-R
Q9 Q10 Q11 Q12: library part MOSFET_N_SOT23, "=Product Description", Manufacturer=DIODES, Package / Case=SOT23, Product Description="MOSFET DIS.1.8A 30V N-CH SOT23 ENHANCEMENT SMT", Product Name=ZXMN3A01FTA
  Q9 Q10: .Checked PCB=., .Checked SCH=.
  Q11 Q12: .Checked PCB=CHK, .Checked SCH=CHK
R1 R2 R3 R4 R5 R11 R13 R14 R15 R20 R21 R22: library part RES_0805, "=Product Description", Package / Case=0805, Tolerance=±1%
  R1: .Checked PCB=CHK, .Checked SCH=CHK, Product Description="RES.(2012) 0805 1K Ohms 1% 1/8W-S 100PPM", Product Name=0805S8F1001T5E, Watt=1/8W-S
  R2: .Checked PCB=CHK, .Checked SCH=CHK, Product Description="RES.(2012) 0805 3.3K Ohms 1% 1/8W-S 100PPM", Product Name=0805S8F3301T5E, Watt=1/8W-S
  R3 R22: .Checked PCB=CHK, .Checked SCH=CHK, Product Description="RES.(2012) 0805 10K Ohms 1% 1/8W-S 100PPM", Product Name=0805S8F1002T5E, Watt=1/8W-S
  R4 R20 R21: .Checked PCB=., .Checked SCH=., Product Description="RES.(2012) 0805 10K Ohms 1% 1/8W-S 100PPM", Product Name=0805S8F1002T5E, Watt=1/8W-S
  R5: .Checked PCB=CHK, .Checked SCH=CHK, Product Description="RES.(2012) 0805 2.1K Ohms 1% 1/8W-S 100PPM", Product Name=0805S8F2101T5E, Watt=1/8W-S
  R11: .Checked PCB=CHK, .Checked SCH=CHK, Product Description="RES.(2012) 0805 3.3 Ohms 1% 1/8W +300PPM~-200PPM", Product Name=RC2012F3R3CS, Watt=1/8W
  R13: .Checked PCB=CHK, .Checked SCH=CHK, Product Description="RES.(2012) 0805 2.7K Ohms 1% 1/8W-S 100PPM", Product Name=0805S8F2701T5E, Watt=1/8W-S
  R14: .Checked PCB=CHK, .Checked SCH=CHK, Product Description="RES.(2012) 0805 1.5K Ohms 1% 1/8W-S 100PPM", Product Name=0805S8F1501T5E, Watt=1/8W-S
  R15: .Checked PCB=CHK, .Checked SCH=CHK, Product Description="RES.(2012) 0805 100 Ohms 1% 1/8W-S 200PPM", Product Name=0805S8F1000T5E, Watt=1/8W-S
R6 R16 R17 R18 R19: library part RES_0805, "=Product Description", Package / Case=0805, Tolerance=±5%, .Checked PCB=CHK, .Checked SCH=CHK, Watt=1/8W-S
  R6: Product Description="RES.(2012) 0805 1K Ohms 5% 1/8W-S 100PPM", Product Name=0805S8J0102T5E
  R16 R17: Product Description="RES.(2012) 0805 4.7K Ohms 5% 1/8W-S 100PPM", Product Name=0805S8J0472T5E
  R18 R19: Product Description="RES.(2012) 0805 1.8K Ohms 5% 1/8W-S 100PPM", Product Name=0805S8J0182T5E
R7: library part RES_2512, "=Product Description", Package=2512, .Checked PCB=., .Checked SCH=., Product Description="RES.(6432) 2512 150m Ohms 1% 2W 200PPM", Product Name=HP122WF150LT4E
R8 R45 R46 R47 R48 R49 R50 R51 R52: library part RES_0805, "=Product Description", Package=0805
  R8: .Checked PCB=., .Checked SCH=., Product Description="RES.(2012) 0805 15K Ohms 5% 1/8W-S 100PPM", Product Name=0805S8J0153T5E
  R45 R46 R47 R48 R49 R50 R51 R52: .Checked PCB=CHK, .Checked SCH=CHK, Product Description="RES.(2012) 0805 130 Ohms 5% 1/8W-S 100PPM", Product Name=0805S8J0131T5E
R9: library part RES_1206, "=Product Description", Package / Case="1206 (3216 Metric)", Tolerance=±1%, .Checked PCB=1206S4F1001T5E, .Checked SCH=1206S4F1001T5E, Product Description="RES.(3216) 1206 1K Ohms 1% 1/4W-S 100PPM", Product Name=1206S4F1001T5E, Watt=1/4W-S
R10: library part RES_AXL_20X9, "=Product Description", Package=AXIAL, .Checked PCB=CHK, .Checked SCH=CHK, Product Description="RES.CEMENT 5W 100 Ohms 5% THT", Product Name=PRW05WJP101B00
R12: library part RES_0805, "=Product Description", Package / Case=0805, Tolerance=±0.5%, .Checked PCB=CHK, .Checked SCH=CHK, Product Description="RES.(2012) 0805 220 Ohms 0.5% 1/2W 100PPM", Product Name=ERJ-P06D2200V, Watt=1/2W
R23: library part RES_0603, "=Product Description", Package / Case=0603, Tolerance=±0.5%, .Checked PCB=CHK, .Checked SCH=CHK, Product Description="RES.(1608) 0603 49.9 Ohms 0.5% 1/16W 25PPM", Product Name=TC0325D499JT5C, Watt=1/16W
R24 R25 R26 R27 R28 R29 R30 R31 R32 R33 R34 R35 R37 R38 R39 R40: library part RES_0805, "=Product Description", Package2=0805
  R24 R25 R34: .Checked PCB=CHK, .Checked SCH=CHK, Product Description="RES.(2012) 0805 10K Ohms 5% 1/8W-S 100PPM", Product Name=0805S8J0103T5E
  R26 R27 R28: .Checked PCB=CHK, .Checked SCH=CHK, Product Description="RES.(2012) 0805 22 Ohms 1% 1/8W-S AUTOMOTIV", Product Name=CQ05S8F220JT5E
  R29 R30 R35 R39 R40: .Checked PCB=CHK, .Checked SCH=CHK, Product Description="RES.(2012) 0805 47.5K Ohms 1% 1/8W-S 100PPM", Product Name=0805S8F4752T5E
  R31 R32: .Checked PCB=CHK, .Checked SCH=CHK, Product Description="RES.(2012) 0805 150 Ohms 5% 1/8W-S 100PPM", Product Name=0805S8J0151T5E
  R33: .Checked PCB=CHK, .Checked SCH=CHK, Product Description="RES.(2012) 0805 130 Ohms 5% 1/8W-S 100PPM", Product Name=0805S8J0131T5E
  R37 R38: .Checked PCB=., .Checked SCH=., Product Description="RES.(2012) 0805 47.5K Ohms 1% 1/8W-S 100PPM", Product Name=0805S8F4752T5E
R41 R42 R43 R44 R53 R54 R55 R56 R57 R58 R59 R60 R61 R62 R63 R64 R65 R66 R67 R68: library part RES_1206, "=Product Description", Package=1206
  R41: .Checked PCB=CHK, .Checked SCH=CHK, Product Description="RES.(3216) 1206 510 Ohms 5% 1/4W-S 100PPM", Product Name=1206S4J0511T5E
  R42 R43 R44: .Checked PCB=., .Checked SCH=., Product Description="RES.(3216) 1206 510 Ohms 5% 1/4W-S 100PPM", Product Name=1206S4J0511T5E
  R53 R54 R55 R56 R57 R58 R59 R60: .Checked PCB=CHK, .Checked SCH=CHK, Product Description="RES.(3216) 1206 200 Ohms 1% 1/4W-S AUTOMOTIV", Product Name=CQ06W4F2000T5E
  R61 R62 R63 R64 R65 R66 R67 R68: .Checked PCB=CHK, .Checked SCH=CHK, Product Description="RES.(3216) 1206 330 Ohms 1% 1/4W-S AUTOMOTIV", Product Name=CQ06W4F3300T5E
SW1: library part TACT_SMD_VT_6MM, "=Product Description", .Checked PCB=CHK, .Checked SCH=CHK, Outline=SWC, Product Description="SWITCH TACT 6x3.5MM 4.3MM 260gf SMD DIPTRONICS", Product Name=DTSMF-31R-V-T/R
TP1 TP2 TP3 TP4 TP5: "Test Point 25mil"
  TP1 TP4 TP5: .Checked PCB=CHK, .Checked SCH=CHK
  TP2: .Checked PCB=., .Checked SCH=.
U1: library part P2576L-AD-TQ5-R, "IC-2576 V.REG.3A ADJ SIMPL.STEP-DOWN SMD TO-263", Manufacturer=UTC, Package / Case="TO263-5 (D2PAK-5)", .Checked PCB=CHK, .Checked SCH=CHK, Product Description="IC-2576 V.REG.3A ADJ SIMPL.STEP-DOWN SMD TO-263", Product Name=P2576L-AD-TQ5-R
U2: "=Product Description", Manufacturer=STM, Package / Case=P2PAK/A, .Checked PCB=CHK, .Checked SCH=CHK, Product Description="IC-29300 REG. LDO. ADJ 3A P2PAK/A", Product Name=LD29300P2MTR
U3: library part MCP1700, "=Product Description", Package / Case=SOT23-3, .Checked PCB=CHK, .Checked SCH=CHK, Product Description="IC-1700 REG LDO 3.3V 0.25A SOT23-3", Product Name=MCP1700T-3302E/TT
U4: library part NCV3063DR2G, "=Product Description", Package=SOIC8, .Checked PCB=CHK, .Checked SCH=CHK, Product Description="IC-3063 INV. SWITCHING REGULATORS SOIC8 SMD ONS", Product Name=NCV3063DR2G
U5: "=Product Description", Package=TO220-3, Product Description="IC-317 V.REG/STABILIZER 1.5A TO220 DOUBLE GAUG ST", Product Name=LM317T-DG
U6: "=Product Description", Manufacturer=SOIC8, Package=SOIC8, Product Description="IC-071 OPAMP JFET 3MHZ SOIC8", Product Name=TL071CDR
U7: "Product Description", Manufacturer=GOSUNCN, Package / Case="LCC (17.6 x 15.7 x 2.3)", .Checked PCB=CHK, .Checked SCH=CHK, Product Description="MODULE GSM/GPRS + ( OPTIONAL )GNSS", Product Name=HZ-MG2609-C1B-MK-01
U8: "IC-32F103C MCU 32BIT 64KB FLASH 48LQFP", .Checked PCB=CHK, .Checked SCH=CHK, Link=https://www.ozdisan.com/integrated-circuits-ics/embedded-ics/microcontrollers/STM32F103C8T7TR, Product Name=STM32F103C8T7TR
U9: library part TXB0102DCUR, "=Product Description", Manufacturer=TEXAS, Package / Case=VSSOP8, .Checked PCB=CHK, .Checked SCH=CHK, Product Description="IC-102 VOLT-LVL TRANSL BI-DIR US8", Product Name=TXB0102DCUR
U10: library part TVS_SOT236, "=Product Description", Manufacturer=STM, Package / Case=SOT23-6, .Checked PCB=CHK, .Checked SCH=CHK, Product Description="DIODE TVS 80W 5V SOT23 SMD", Product Name=ESDA6V1BC6
U11: library part TRANS_RS232, "=Product Description", Package=TSSOP20, .Checked PCB=CHK, .Checked SCH=CHK, Product Description="IC-3222 DRIVER/RCVR RS232 LP 20-TSSOP", Product Name=ST3222BTR
U12 U13 U14 U15 U16 U17 U18 U19: library part OPTCOP, "=Product Description", Manufacturer=LITEON, Package=SSOP4, .Checked PCB=CHK, .Checked SCH=CHK, Product Description="IC-217 OPTO. 3750V SSOP4", Product Name=LTV-217-B-G
Y1: library part CRYS-THT, "=Product Description", Package / Case=HC-49S, .Checked PCB=CHK, .Checked SCH=CHK, Product Description="CRYSTAL 8MHZ HC49S 20pF 30ppm SHORT BULK RALTRON", Product Name=AS-8.000-20-H35

## Free pads (board coordinates)
  round 180 hole 140: 1(570.87,370.08) 2(2183.07,687.01) 3(570.87,4944.88) 3(879.92,1889.76) 3(879.92,3425.2) 3(2183.07,4627.95) 3(6124.02,687.01) 3(6124.02,4627.95) 3(7427.17,3425.2) 3(7736.22,4944.88) 4(7736.22,370.08) 5(7427.17,1889.76)

## Via types
v1: diameter 35, hole 25, Top Layer to Bottom Layer, 102 vias
v2: diameter 25, hole 15, Top Layer to Bottom Layer, tented both sides, 70 vias
v3: diameter 35, hole 30, Top Layer to Bottom Layer, tented both sides, 12 vias
v4: diameter 45, hole 30, Top Layer to Bottom Layer, tented both sides, 6 vias
v5: diameter 35, hole 25, Top Layer to Bottom Layer, tented both sides, 3 vias
v6: diameter 25, hole 15, Top Layer to Bottom Layer, 3 vias
v7: diameter 55, hole 35, Top Layer to Bottom Layer, 1 vias
v8: diameter 40, hole 30, Top Layer to Bottom Layer, tented both sides, 1 vias

## Nets (pads, with @x,y where several pads share a name; then routed paths per layer and width w, separated by ;. In a path a pad name is that pad's centre, name@x,y a point inside that pad or via, vN(x,y) a via of type N, cw(c..) or ccw(c..) an arc to the next point about the centre after c; other vN are vias at no path point)
+3V3: C24.2 C25.2 C26.2 C27.2 C28.2 C29.2 C33.1 C34.2 C35.1 C36.1 C41.1 FB2.2 P1.2 TP3.1 U8.1 U8.9 U8.24 U8.36 U8.48 U9.7 U11.19 U11.20 U12.4 U13.4 U14.4 U15.4 U16.4 U17.4 U18.4 U19.4 | length 12257.7
  Top Layer w10: C33.1@3902.78,1062.22 3932.28,1091.73 U8.36@3992,1091.73 ; U8.48@4268.27,1032 4268.27,936.18 C36.1@4269.45,935 v2(4510,935) ; U8.1@4328,1091.73 4508.27,1091.73 v2(4510,1090) ; U8.9@4328,1249.21 4328.5,1249.71 4361.93,1249.71 4362.22,1250 C34.2@4506.69,1250 ; C34.2@4510,1249.45 C34.2@4515.55,1255 4515.55,1340.55 4590,1415 5040,1415 5060,1395 5060,1245 5079.84,1225.16 U9.7@5234,1225.16 ; v2(5995,2485) U14.4@5995,2560 ; v2(6275,2485) U15.4@6275,2565 ; v2(6400,2485) U16.4@6400,2565
  Top Layer w12: U11.19@3442.87,990.59 U11.20@3442.87,1016.18 3471.69,1045 3785.55,1045 v4(3815.55,1075) ; C35.1@4000.55,1520 4000.55,1384.45 4017,1368 U8.24@4051.73,1368 ; v2(5590,2485) U12.4@5590,2565 ; v2(5865,2490) U13.4@5865,2560 U13.4@5875,2560 ; v2(6665,2485) U17.4@6665,2558.94 ; v2(6800,2485) U18.4@6800,2558.94 ; v2(7050,2485) U19.4@7050,2560
  Top Layer w20: v2(4510,1200) C34.2@4510,1249.45
  Top Layer w25: v4(3815.55,1075) 3835.28,1055.28 3889.72,1055.28 C33.1@3890,1055.55 ; v4(3850,1390) 3850,1520
  Top Layer w40: FB2.2@2614.53,1995 2664.53,2045
  Top Layer w50: 2664.53,2045 2669.53,2050 2875,2050 2890,2035 2900,2045 TP3.1@2970,2045 ; 2875,2035 3150,1760 3550,1760 3790,1520 3850,1520 C35.1@4000.55,1520
  Bottom Layer w30: v4(3815.55,1075) 3815.55,669.45 3935,550 P1.2@4005,550
  Bottom Layer w35: v4(3815.55,1075) 3815.55,1355.55 v4(3850,1390) 3905,1335 3905,690 3955,640 4445,640 4510,705 v2(4510,935) v2(4510,1090) v2(4510,1200)
  Bottom Layer w50: TP3.1@2970,2045 3015,2045 3145,2175 3145,2375 3255,2485 v2(5590,2485) v2(5995,2485) v2(6275,2485) v2(6400,2485) v2(6665,2485) v2(6800,2485) v2(7050,2485)
+3V8: C5.1 FB5.2 R5.1 R31.1 R32.1 TP2.1 U2.4 | length 7793.3
  Top Layer w12: R32.1@6752.5,2210 6760,2217.5 6760,2247.97 6767.03,2255 6955,2255 6969.5,2240.5 6969.5,2228 R31.1@6987.5,2210
  Top Layer w25: TP2.1@2610,2340 2610,2445 ; 2610.5,2405.5 2610.5,2490 C5.1@2612.75,2492.25 ; C5.1@2615,2494.5 2635.5,2494.5 3125,2005 3125,1905 3160,1870 5155,1870 v3(5435,1590) ; C5.1@2622.75,2502.25 2632.5,2512 R5.1@2632.5,2660 2632.5,2762.5 2676.93,2806.93 U2.4@2676.93,2910
  Top Layer w50: R31.1@6988.5,2210 7815.71,2210 7845,2180.71 7845,1635
  Bottom Layer w25: v3@5437.5,1592.5 5525,1505 6765,1505 7095,1835 v7(7095,2210)
+24V: C11.1 C12.1 D6.1 P2.2 R8.1 TP4.1 | length 7361.4
  Top Layer w50: P2.2@550,4550 425,4425 425,4270 545,4150 825,4150 955,4280 955,4430 1016.5,4491.5 1054.5,4491.5 1055,4492 R8.1@1055,4492.5 1055,4725 1125,4795 2285,4795 2365,4715 2365,4375 ; C12.1@2195,3865 D6.1@2195,4290.09 2300.09,4290.09 2365,4355 2365,4375 ; C12.1@2200,3830 2200,3775 2285,3690 v4(2800,3690) ; TP4.1@2455,4285 2365,4375 ; v8@2879.5,2630.5 2880,2631 v4(2880,3045)
  Bottom Layer w50: v4(2800,3690) 2880,3610 v4(2880,3045) ; v8(2880,2630) 2875,2625 2875,1780 3013.73,1641.27 3277.63,1641.27 3319.38,1599.52 3319.38,1484.38 3293.19,1458.19 3193.58,1458.19
+VIN: C1.1 C8.1 C9.1 D1.1 D8.1 D17.2 D18.2 D19.2 D20.2 J6.9 J6.10 J6.11 K1.8 K2.8 K3.8 K4.8 R7.1 R41.2 R42.2 R43.2 R44.2 U1.1 U4.6 | length 12877.1
  Top Layer w35: C9.1@1230.04,4025.59 U4.6@1230.04,4315.99
  Top Layer w50: C9.1@1230.04,4025.59 C9.1@1229.45,4025 1274.5,4025 1748,3551.5 D1.1@1748,3150 ; C1.1@1545,2745 C1.1@1560.53,2760.53 ; C1.1@1555,2745 1555,2695 1530,2670 1480,2670 1390,2580 D8.1@1390,2050 ; U1.1@1971,3049 1849,3049 D1.1@1748,3150 ; K4.8@3020,2559 R44.2@3020,2336.01 3170.57,2336.01 D20.2@3171.57,2335 ; K3.8@3663.67,2559 3663.67,2337.34 3665,2336.01 3815.57,2336.01 D19.2@3816.57,2335 ; K2.8@4307.33,2559 4307.33,2337.1 4308.43,2336.01 4458.99,2336.01 D18.2@4460,2335 ; K1.8@4951,2559 4951,2337.01 R41.2@4950,2336.01 5095.57,2336.01 D17.2@5096.57,2335 ; J6.9@7165,3705.73 J6.9@7165.73,3705 ; J6.10@7360,3710 J6.10@7365,3705 ; J6.11@7564.27,3705 J6.11@7565,3705.73 ; D8.1@1390,2050 1336,1996 1336,1975 1390,2029 D8.1@1390,2050 ; C1.1@1560.53,2760.53 1570,2770 v3@1570,2895 ; C1.1@1560.53,2760.53 1560.53,2885.53 v3@1570,2895 ; v3@1570,2895 v3(1580,2905) 1580,2982 D1.1@1748,3150
  Bottom Layer w50: v3(1580,2905) 1710,2775 2930,2775 3020,2685 3020,2675 ; K4.8@3020,2559 3020,2675 ; K3.8@3663.67,2559 3663.67,2696.33 ; K2.8@4307.33,2559 4307.33,2702.33 ; K1.8@4951,2559 4951,2714 ; J6.9@7165.73,3705 7165.73,3619.27 7290,3495 7290,2800 7265,2775 5012,2775 4951,2714 ; 7290,3510 7365,3585 ; J6.10@7365,3705 7365,3585 ; J6.11@7564.27,3705 7564.27,3639.27 7510,3585 7365,3585 ; 3020,2675 3130,2785 3575,2785 3663.67,2696.33 ; 3663.67,2696.33 3663.67,2708.67 3735,2780 4230,2780 4307.33,2702.67 4307.33,2702.33 ; 4307.33,2702.33 4385,2780 4885,2780 4951,2714